# Altium PCB IoT_SYNTHPATCH_ANALOG.PcbDoc (part 2 of 2)
Units mm, origin at the board's own origin, x right, y up, seen from the top; angles counter-clockwise.
Board outline 109 x 54 mm, 4 copper layers (Top Layer, PWR, GND, Bottom Layer), stack 1.587 mm thick; 165 components, 141 nets, 542 pads, 344 vias.
Unrouted connection lines stored in the file: 4.
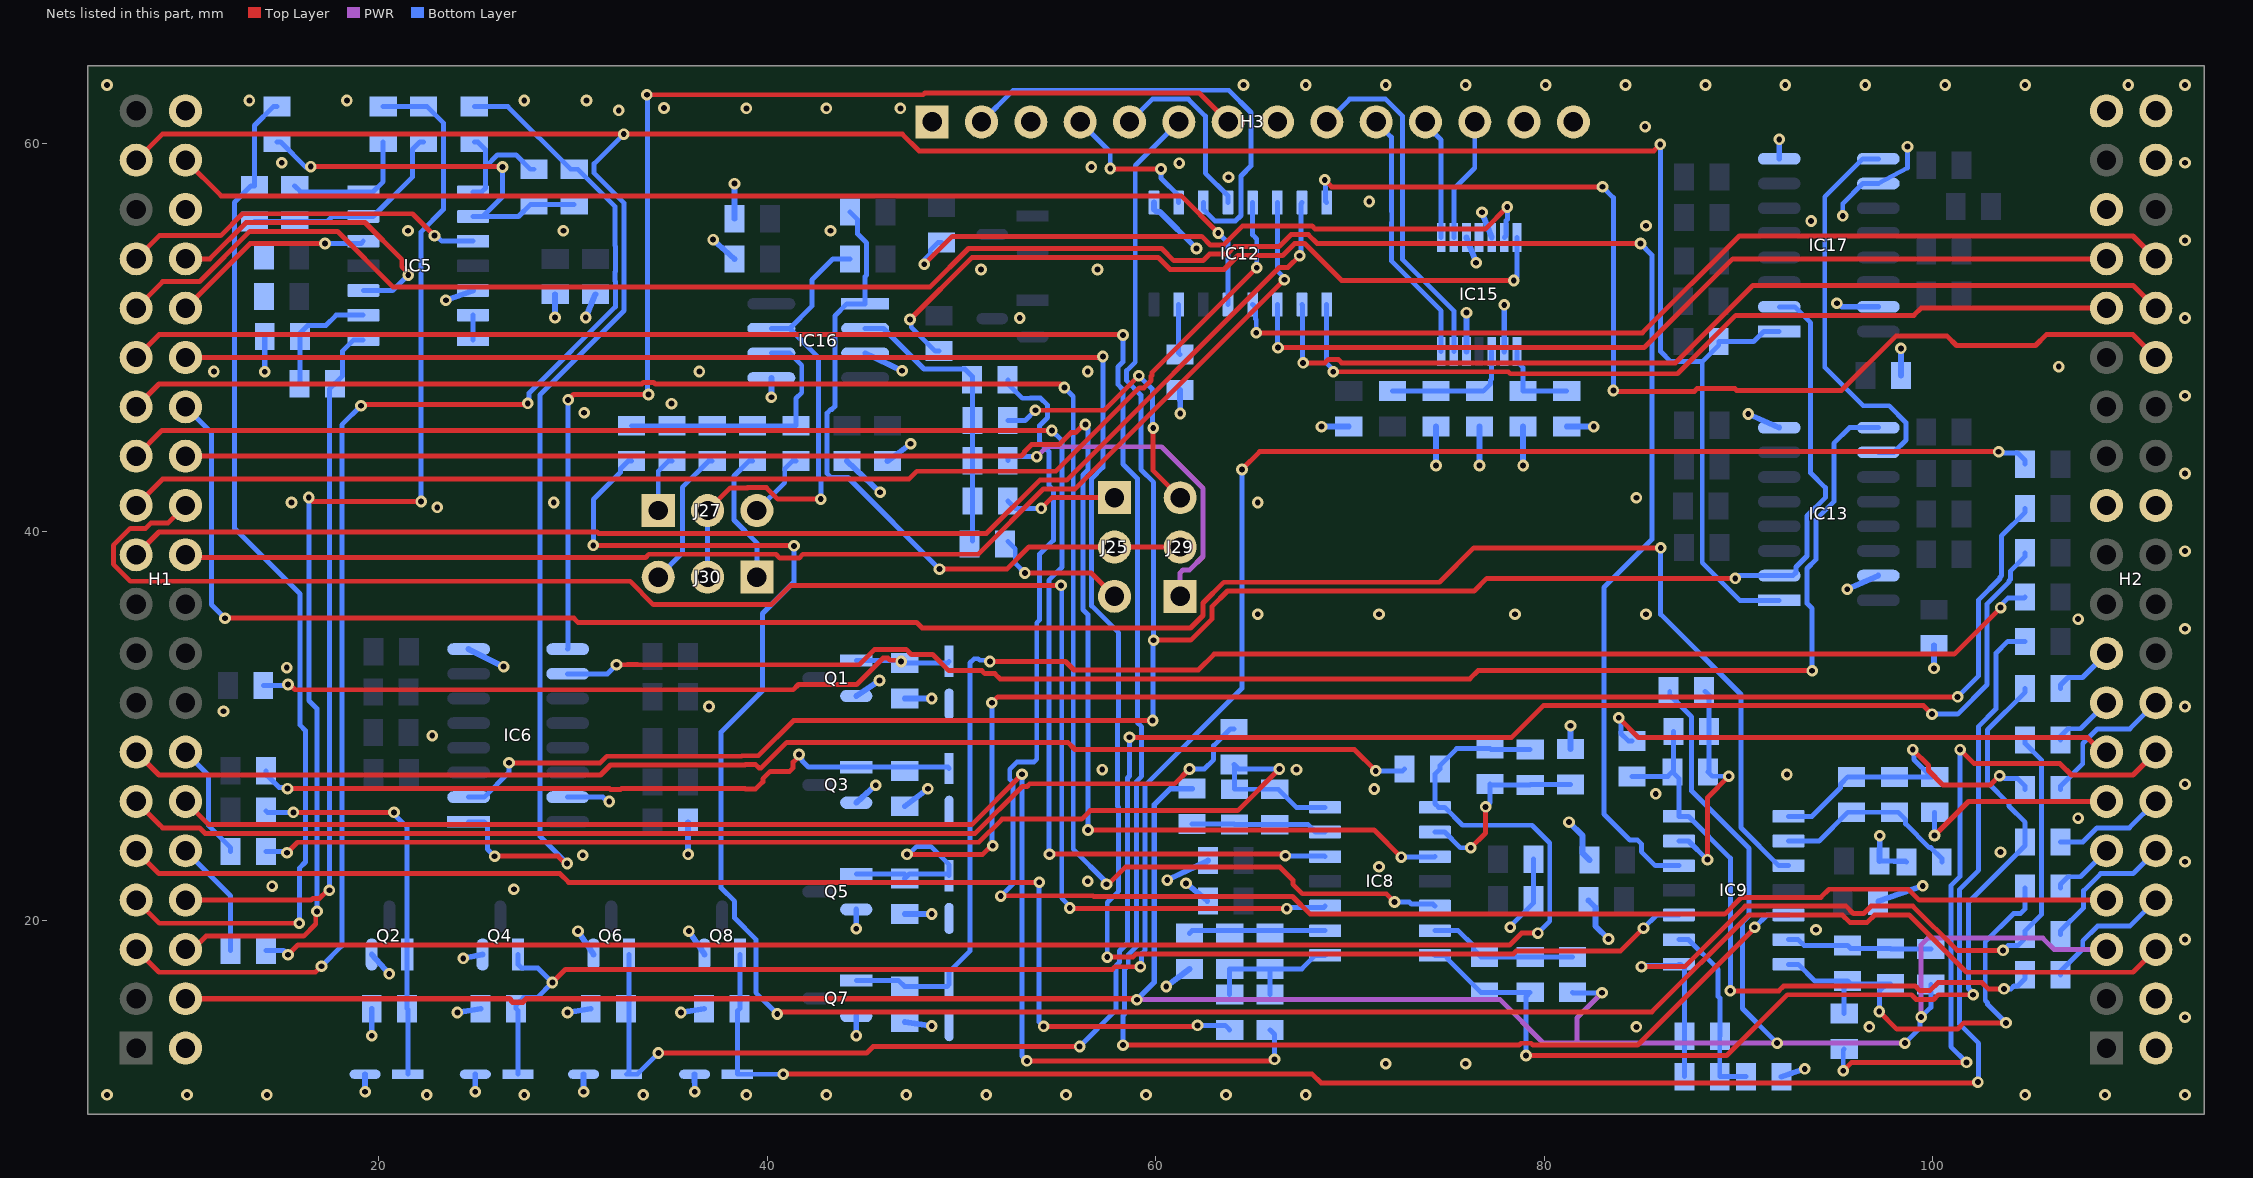
[diagram p4: the nets of this part, all layers, seen from the top]

## Via types
v1: diameter 0.6, hole 0.3, Top Layer to Bottom Layer, 342 vias
v2: diameter 0.8, hole 0.4, Top Layer to Bottom Layer, 2 vias

## Nets (pads, with @x,y where several pads share a name; then routed paths per layer and width w, separated by ;. In a path a pad name is that pad's centre, name@x,y a point inside that pad or via, vN(x,y) a via of type N, cw(c..) or ccw(c..) an arc to the next point about the centre after c; other vN are vias at no path point) (continued)
GND: C30.1 C31.1 C34.2 C44.2 C45.2 C46.2 C47.2 C48.2 C49.2 C50.2 C51.2 C58.1 C59.1 C60.2 C67.1 C68.1 C70.1 C71.1 C73.1 C74.2 C75.2 C76.2 C77.2 C87.2 D3.2 D4.2 D5.2 D6.2 D7.2 D8.2 D9.2 D10.2 H1.2 H1.36 H1.40 H2.2 H2.4 H2.23 H2.24 H2.35 H2.38 H2.39 H2.40 H3.1 H3.3 H3.8 H3.13 H3.14 IC5.12 IC6.8 IC6.15 IC12.1 IC13.8 IC13.15 IC15.2 IC15.5 IC15.10 IC15.11 IC15.12 IC16.3 IC16.5 IC17.8 IC17.10 IC17.15 Q1.2 Q2.2 Q3.2 Q4.2 Q5.2 Q6.2 Q7.2 Q8.2 R20.1 R30.1 R31.1 R42.1 R43.1 R46.1 R47.1 R50.1 R51.1 R54.1 R56.1 R66.1 R68.1 R80.1 | length 105
  Top Layer w0.254: v1(31.861,26.105) v1@31.922,26.166
  Bottom Layer w0.25: IC17.10@97.209,57.93 98.709,58.73 v1(98.709,59.83) ; C48.2@97.277,23.036 R56.1@98.653,22.985
  Bottom Layer w0.254: IC6.15@29.721,26.332 31.54,26.332 31.768,26.105 v1(31.861,26.105) ; v1(78.257,19.634) 78.257,19.683 79.45,20.876 C46.2@79.45,21.063 C47.2@79.45,23.137 ; v1(95.377,56.261) 95.377,56.896 96.411,57.93 IC17.10@97.209,57.93 ; C48.2@97.277,23.036 98.602,23.036 R56.1@98.653,22.985
  Bottom Layer w0.3: v1(14.12,48.24) R20.1@14.12,50.044 ; D4.2@19.289,12.061 v1(19.29,11.16) ; Q2.2@19.627,18.23 v1(20.53,17.23) ; R31.1@19.629,15.436 v1(19.63,14.04) ; v1(23.45,51.92) IC5.12@24.845,52.418 ; v1(24.04,15.24) R43.1@25.24,15.436 ; v1(24.34,18.03) Q4.2@25.338,18.23 ; IC6.8@24.62,33.952 v1(26.42,33.05) ; v1(24.96,11.16) D6.2@24.964,12.061 ; v1(29.07,51.03) C31.1@29.075,52.226 ; v1(29.71,15.24) R47.1@30.906,15.436 ; v1(30.25,19.43) Q6.2@31.048,18.23 ; v1(30.54,11.16) D8.2@30.541,12.061 ; v1(30.65,51.03) C59.1@31.149,52.226 ; v1(35.55,15.24) R51.1@36.748,15.436 ; v1(35.92,23.382) C34.2@35.922,25.038 C34.2@35.922,25.038 ; v1(35.96,19.43) Q8.2@36.759,18.23 ; D10.2@36.256,12.061 v1(36.26,11.16) ; v1(37.21,55.04) C74.2@38.311,54.041 ; v1(38.31,57.921) C75.2@38.311,56.115 C75.2@38.311,56.115 ; IC16.5@40.208,47.922 v1(40.21,46.92) ; C77.2@44.11,43.632 v1(45.81,42.03) ; v1(44.58,14.05) Q7.2@44.581,15.054 ; v1(44.58,19.55) Q5.2@44.581,20.549 ; Q3.2@44.581,26.044 v1(45.58,26.94) ; Q1.2@44.581,31.539 v1(45.78,32.34) ; IC16.3@45.04,49.192 v1(46.94,48.29) ; C76.2@46.184,43.632 v1(47.38,44.53) ; R50.1@47.074,14.754 v1(48.47,14.55) ; R46.1@47.074,20.307 v1(48.47,20.31) ; R42.1@47.074,25.861 v1(48.27,26.76) ; R30.1@47.074,31.414 v1(48.47,31.41) ; IC12.1@59.911,56.948 59.911,56.598 60.036,56.473 60.215,56.473 v1(62.103,54.585) ; v1(60.54,16.58) R54.1@61.736,17.485 ; v1(60.59,22.06) C44.2@62.687,23.061 ; R80.1@61.257,47.291 v1(61.26,46.09) ; v1(61.56,21.89) C45.2@62.657,20.987 ; v1(68.54,45.41) C73.1@69.944,45.41 ; v1(74.43,43.41) C71.1@74.431,45.41 ; IC15.5@76,49.277 v1(76,51.28) ; IC15.10@76,55.153 v1(76.5,53.85) ; v1(76.67,43.41) C70.1@76.675,45.41 ; v1(76.8,56.45) IC15.12@77.3,55.153 ; IC15.2@77.95,49.277 v1(77.95,51.68) ; C68.1@78.918,45.41 v1(78.92,43.41) ; C67.1@81.162,45.41 v1(82.56,45.41) ; v1(81.28,25.044) 81.984,24.34 81.984,23.448 C50.2@82.346,23.086 ; v1(81.36,30.01) R66.1@81.362,28.808 ; C51.2@82.285,21.012 82.647,20.65 82.647,19.69 v1(83.312,19.025) ; v1(90.51,46.06) IC13.8@92.107,45.357 ; IC17.8@92.107,59.2 v1(92.11,60.2) ; R68.1@92.223,11.936 v1(93.42,12.34) ; v1(95.078,51.765) 95.159,51.765 95.344,51.58 IC17.15@97.209,51.58 ; v1(95.61,37.04) IC13.15@97.209,37.737 ; C49.2@97.202,20.962 v1(99.5,21.76) ; C48.2@97.277,23.036 v1(97.28,24.34) ; C87.2@98.37,48.041 v1(98.37,49.44) ; C60.2@100.075,34.156 v1(100.08,32.96)
  other v1: 6,11 10.12,11 14.23,11 22.46,11 27.48,11 33.61,11 38.92,11 43.04,11 47.15,11 51.27,11 55.38,11 59.5,11 63.62,11 67.73,11 104.77,11 108.88,11 113,11 71.85,12.6 75.96,12.6 84.75,14.5 96.75,14.5 113,15 113,19 94,19.5 26.949,21.59 14.5,21.75 56.5,22 71.5,22.75 113,23 30.492,23.343 103.5,23.5 107.5,25.25 85.75,26.5 71.25,26.75 113,27 92.5,27.5 57.25,27.75 67.25,27.75 22.75,29.5 12,30.75 37,31 113,31 15.25,33 113,35 107.5,35.5 65.25,35.75 71.5,35.75 78.5,35.75 85.25,35.75 113,39 23,41.25 15.5,41.5 29,41.5 65.25,41.5 84.75,41.75 113,43 30.568,46.126 35.064,46.595 113,47 11.5,48.25 36.5,48.25 56.5,48.25 106.5,48.5 53,51 113,51 51,53.5 57,53.5 113,55 21.5,55.5 29.5,55.5 43.25,55.5 85.25,55.75 93.75,56 71,57 63.75,58.25 56.686,58.78 61.214,58.979 15,59 113,59 85.203,60.858 32.346,61.697 38.92,61.8 43.04,61.8 46.85,61.8 34.683,61.82 13.33,62.2 18.35,62.2 27.48,62.2 30.69,62.2 6,63 64.52,63 67.73,63 71.85,63 75.96,63 80.08,63 84.19,63 88.31,63 92.42,63 96.54,63 100.65,63 104.77,63 110.08,63 113,63
IN_J26: H2.7 R126.1 | length 88.3
  Top Layer w0.254: v1(52.019,21.234) 52.037,21.252 56.784,21.252 56.818,21.217 67.046,21.217 67.956,20.307 89.3,20.307 90.162,21.169 94.251,21.169 94.67,21.589 98.759,21.589 99.318,21.03 H2.7@108.96,21.03
  Bottom Layer w0.254: v1(52.019,21.234) 52.657,21.873 52.657,27.075 52.484,27.248 52.484,27.768 52.852,28.135 53.725,28.135 53.873,28.284 53.873,35.304 54.026,35.457 54.026,38.85 54.729,39.553 54.729,42.161 54.5,42.39 54.5,44.126 54.026,44.6 54.026,45.472 54.432,45.878 54.432,46.513 54.064,46.88 53.545,46.88 53.535,46.871 53.128,46.871 52.383,47.616 R126.1@52.383,47.803
IN_J28: H2.6 R130.1 | length 117.6
  Top Layer w0.254: v1(31.039,39.294) 31.041,39.292 41.349,39.292 41.351,39.294 v1(41.377,39.268) ; v1(40.513,15.164) 40.623,15.273 85.551,15.273 90.538,20.261 95.362,20.261 95.742,19.881 96.638,19.881 97.018,20.261 98.802,20.261 101.751,17.313 110.323,17.313 H2.6@111.5,18.49
  Bottom Layer w0.254: v1(31.039,39.294) 31.039,41.657 32.44,43.059 32.44,43.246 32.826,43.632 R130.1@33.013,43.632 ; v1(40.513,15.164) 39.413,16.264 39.413,19.012 38.315,20.109 38.315,20.964 37.617,21.662 37.617,29.676 39.751,31.809 39.751,35.785 41.377,37.411 v1(41.377,39.268)
IO2: H1.38 IC12.13 | length 58.6
  Top Layer w0.254: H1.38@10.04,59.13 11.876,57.294 61.309,57.294 v1(63.224,55.38)
  Bottom Layer w0.254: v1(63.224,55.38) 63.721,54.882 IC12.13@63.721,51.698
IO3: H1.37 IC6.1 IC13.1 IC17.1 R1.1 | length 160.3
  Top Layer w0.254: H1.37@7.5,59.13 8.843,60.473 v1(32.606,60.473) 46.954,60.473 47.814,59.614 85.649,59.614 v1(85.979,59.944) ; v1(25.959,23.292) 29.218,23.292 29.599,22.911 v1(29.693,22.911)
  Bottom Layer w0.254: IC6.1@24.62,25.062 25.418,25.062 25.595,24.885 25.595,23.656 v1(25.959,23.292) ; v1(29.693,22.911) 28.292,24.311 28.292,47.052 32.63,51.39 32.63,56.919 31.084,58.465 31.084,58.952 v1(32.606,60.473) ; v1(85.979,59.944) 86.005,59.918 86.005,49.282 86.528,48.758 88.145,48.758 ; IC13.1@92.107,36.467 90.083,36.467 88.145,38.405 88.145,48.758 ; IC17.1@92.107,50.31 91.309,50.31 90.793,49.794 R1.1@88.993,49.794 88.993,49.607 88.145,48.758
IO16: H3.5 IC12.4 | length 9.7
  Bottom Layer w0.254: H3.5@58.65,61.1 59.827,62.277 61.678,62.277 62.553,61.402 62.553,58.466 63.721,57.298 IC12.4@63.721,56.948
IO17: H3.4 IC12.2 | length 7.8
  Top Layer w0.254: v1(57.658,58.699) 57.683,58.674 v1(60.274,58.674)
  Bottom Layer w0.254: H3.4@56.11,61.1 57.658,59.552 v1(57.658,58.699) ; v1(60.274,58.674) 60.274,58.205 61.181,57.298 IC12.2@61.181,56.948
IO18: H3.2 IC12.3 | length 23.2
  Bottom Layer w0.254: H3.2@51.03,61.1 52.661,62.731 63.764,62.731 64.907,61.588 64.907,58.836 64.389,58.318 64.389,56.283 64.102,55.996 63.34,55.996 63.329,56.007 63.042,56.007 62.451,56.598 IC12.3@62.451,56.948
IO35: H3.9 IC15.6 | length 18
  Bottom Layer w0.254: H3.9@68.81,61.1 69.987,62.277 71.838,62.277 72.713,61.402 72.713,54.008 75.35,51.371 IC15.6@75.35,49.277
IO36: H3.11 IC15.8 | length 6.3
  Bottom Layer w0.254: H3.11@73.89,61.1 73.89,60.978 74.7,60.169 IC15.8@74.7,55.153
IO37: H3.10 IC15.7 | length 13.2
  Bottom Layer w0.254: H3.10@71.35,61.1 72.136,60.314 72.136,56.487 72.153,56.47 72.153,55.95 72.136,55.933 72.136,53.943 74.7,51.379 IC15.7@74.7,49.277
IO42: H3.12 IC15.9 | length 6.4
  Bottom Layer w0.254: IC15.9@75.35,55.153 75.35,57.647 76.43,58.727 H3.12@76.43,61.1
IO47: H3.6 IC6.2 IC13.2 IC17.2 | length 120.3
  Top Layer w0.254: v1(26.695,28.1) 31.397,28.1 31.734,28.437 38.668,28.437 38.694,28.462 39.542,28.462 41.356,30.277 v1(59.842,30.277) ; v1(59.893,34.412) 61.804,34.412 62.888,35.496 62.888,36.139 63.693,36.944 76.396,36.944 77.046,37.594 v1(89.842,37.594)
  Bottom Layer w0.254: IC6.2@24.62,26.332 25.418,26.332 26.695,27.61 v1(26.695,28.1) ; v1(59.842,30.277) 59.868,30.302 v1@59.868,34.412 ; v1(59.893,34.412) 59.893,42.545 59.243,43.195 59.243,47.033 58.504,47.772 58.504,48.291 58.945,48.732 58.945,58.855 H3.6@61.19,61.1 ; v1(89.842,37.594) 89.985,37.737 IC13.2@92.107,37.737 92.81,37.737 92.973,37.9 92.973,38.182 93.537,38.745 93.537,40.808 94.48,41.752 94.48,42.271 93.727,43.025 93.727,50.759 92.906,51.58 IC17.2@92.107,51.58
IO48: H3.7 IC6.9 | length 63.2
  Top Layer w0.254: v1(29.743,46.787) 30.023,47.066 v1(33.884,47.066) ; v1(33.799,62.5) 48.024,62.5 48.111,62.587 62.243,62.587 H3.7@63.73,61.1
  Bottom Layer w0.254: IC6.9@29.721,33.952 29.743,33.974 v1(29.743,46.787) ; v1(33.799,62.5) 33.841,62.458 33.841,47.109 v1(33.884,47.066)
LED_DS4: H1.23 IC12.5 | length 66.4
  Top Layer w0.254: H1.23@7.5,41.35 8.863,42.713 38.781,42.713 38.788,42.721 47.305,42.721 47.696,43.112 54.862,43.112 59.154,47.404 59.391,47.404 59.758,47.772 59.758,48.008 59.799,48.049 59.799,48.191 v1(65.202,53.594)
  Bottom Layer w0.254: IC12.5@64.991,56.948 64.991,55.281 65.202,55.071 v1(65.202,53.594)
LED_DS5: H1.22 IC12.6 | length 66.9
  Top Layer w0.254: H1.22@10.04,38.81 10.183,38.667 33.726,38.667 33.896,38.838 40.449,38.838 40.646,38.641 41.636,38.641 41.832,38.838 50.854,38.838 54.22,42.204 55.851,42.204 v1(66.624,52.977)
  Bottom Layer w0.254: IC12.6@66.261,56.948 66.261,53.434 66.624,53.071 v1(66.624,52.977)
LED_DS6: H1.21 IC12.7 | length 69.1
  Top Layer w0.254: H1.21@7.5,38.81 8.677,39.987 31.232,39.987 31.307,39.913 51.287,39.913 54.032,42.658 55.418,42.658 66.364,53.604 66.804,53.604 v1(67.412,54.212)
  Bottom Layer w0.254: v1(67.412,54.212) 67.471,54.271 67.471,56.888 IC12.7@67.531,56.948
LED_DS7: H2.30 IC12.8 | length 56.5
  Top Layer w0.254: v1(68.707,58.115) 69.063,57.76 v1(83.007,57.76) ; v1(83.566,47.269) 83.609,47.227 87.737,47.227 87.874,47.363 89.82,47.363 89.914,47.269 95.31,47.269 98.108,50.067 100.76,50.067 101.239,49.589 105.306,49.589 105.864,50.147 110.323,50.147 H2.30@111.5,48.97
  Bottom Layer w0.254: v1(68.707,58.115) 68.754,58.068 68.754,56.995 IC12.8@68.801,56.948 ; v1(83.007,57.76) 83.566,57.201 v1(83.566,47.269)
LED_DS8: H2.31 IC12.9 | length 44.9
  Top Layer w0.254: v1(69.143,48.237) 78.155,48.237 78.259,48.133 86.87,48.133 89.875,51.138 99.036,51.138 99.408,51.51 H2.31@108.96,51.51
  Bottom Layer w0.254: IC12.9@68.801,51.698 68.801,48.672 69.143,48.33 v1(69.143,48.237)
LED_DS9: H2.32 IC12.10 | length 49.2
  Top Layer w0.254: v1(67.589,48.692) 68.711,48.692 68.883,48.864 69.402,48.864 69.574,48.692 86.763,48.692 90.758,52.687 110.323,52.687 H2.32@111.5,51.51
  Bottom Layer w0.254: IC12.10@67.531,51.698 67.56,51.669 67.56,48.721 v1(67.589,48.692)
LED_DS10: H2.33 IC12.11 | length 46.8
  Top Layer w0.254: v1(66.294,49.479) 85.146,49.479 89.717,54.05 H2.33@108.96,54.05
  Bottom Layer w0.254: IC12.11@66.261,51.698 66.277,51.681 66.277,49.496 v1(66.294,49.479)
LED_DS11: H2.34 IC12.12 | length 50.4
  Top Layer w0.254: v1(65.176,50.241) 76.507,50.241 76.524,50.224 77.044,50.224 77.061,50.241 85.061,50.241 90.047,55.227 110.323,55.227 H2.34@111.5,54.05
  Bottom Layer w0.254: IC12.12@64.991,51.698 65.139,51.55 65.139,50.96 65.176,50.922 v1(65.176,50.241)
LED_Q10: H1.12 R96.1 | length 73.9
  Top Layer w0.254: H1.12@10.04,26.11 11.233,24.917 50.521,24.917 v1(53.111,27.508) ; v1(53.365,12.751) 66.04,12.751 v1(66.116,12.827)
  Bottom Layer w0.254: v1(53.111,27.508) 53.111,13.005 v1(53.365,12.751) ; R96.1@65.884,14.351 66.116,14.118 v1(66.116,12.827)
LED_Q11: H1.14 R97.1 | length 6.1
  Bottom Layer w0.254: H1.14@10.04,28.65 11.217,27.473 11.217,24.875 12.367,23.726 R97.1@12.367,23.538
LED_Q12: H1.13 R102.1 | length 67.3
  Top Layer w0.254: H1.13@7.5,28.65 8.677,27.473 31.412,27.473 31.922,27.983 38.856,27.983 38.882,28.008 39.401,28.008 39.574,27.835 39.686,27.835 41.002,29.151 55.48,29.151 55.845,28.786 70.228,28.786 v1(71.331,27.683)
  Bottom Layer w0.254: v1(71.331,27.683) 72.719,27.683 R102.1@72.821,27.785
LED_Q13: H2.17 R103.1 | length 3.2
  Bottom Layer w0.254: R103.1@106.594,31.92 106.594,32.108 106.98,32.493 107.723,32.493 H2.17@108.96,33.73
LED_Q14: H2.16 R108.1 | length 7.5
  Bottom Layer w0.254: R108.1@106.594,26.713 106.594,26.901 107.738,28.044 107.738,29.093 108.496,29.851 110.161,29.851 H2.16@111.5,31.19
LED_Q15: H2.14 R109.1 | length 35.4
  Top Layer w0.254: v1(95.402,12.243) 95.834,12.675 v1(101.752,12.675) ; v1(101.422,28.778) 102.141,28.059 106.568,28.059 107.154,27.473 110.323,27.473 H2.14@111.5,28.65
  Bottom Layer w0.254: v1(95.402,12.243) 95.402,13.311 R109.1@95.451,13.36 ; v1(101.422,28.778) 101.422,22.254 100.946,21.778 100.946,13.481 v1(101.752,12.675)
LED_Q16: H2.15 R114.1 | length 3.3
  Bottom Layer w0.254: R114.1@106.594,29.279 106.594,29.466 106.98,29.852 107.622,29.852 H2.15@108.96,31.19
LED_Q17: H2.13 R115.1 | length 27.4
  Top Layer w0.254: v1(83.845,30.415) 84.855,29.405 107.974,29.405 108.73,28.65 H2.13@108.96,28.65
  Bottom Layer w0.254: v1(83.845,30.415) 83.845,30.321 83.951,30.216 83.951,29.611 84.336,29.226 R115.1@84.524,29.226
NetC32_1: C32.1 IC5.8 R26.2 | length 6.5
  Bottom Layer w0.254: IC5.8@24.845,57.498 25.296,57.498 25.494,57.696 25.494,58.791 ; R26.2@24.91,60.065 25.097,60.065 25.483,59.68 25.483,58.802 25.494,58.791 ; C32.1@27.983,58.663 27.796,58.663 27.056,59.403 26.105,59.403 25.494,58.791
NetC32_2: C32.2 IC5.9 R22.2 R23.2 | length 20.6
  Top Layer w0.254: v1(16.49,58.797) 26.344,58.797 v1(26.365,58.776)
  Bottom Layer w0.254: R23.2@14.75,60.065 14.937,60.065 16.227,58.776 16.469,58.776 v1(16.49,58.797) ; IC5.9@24.845,56.228 IC5.9@25.345,56.228 ; v1(26.365,58.776) 26.365,57.248 IC5.9@25.345,56.228 ; R22.2@30.057,56.838 C32.2@27.983,56.838 27.796,56.838 27.186,56.228 IC5.9@25.345,56.228
NetC33_1: C33.1 IC5.7 R27.2 | length 6.9
  Bottom Layer w0.254: C33.1@15.664,57.801 15.967,57.498 IC5.7@19.195,57.498 19.695,57.498 20.22,58.023 R27.2@20.22,60.065
NetC33_2: C33.2 IC5.6 R21.2 R25.1 | length 11.2
  Bottom Layer w0.254: R25.1@13.59,55.976 C33.2@15.664,55.976 17.34,55.976 17.592,56.228 IC5.6@19.195,56.228 19.695,56.228 21.721,58.254 21.721,59.68 22.106,60.065 R21.2@22.294,60.065
NetC35_1: C35.1 IC8.1 R52.2 R55.1 R96.2 | length 7.8
  Bottom Layer w0.254: R55.1@63.81,16.176 R52.2@63.81,17.485 C35.1@65.884,17.485 ; R96.2@65.884,16.176 C35.1@65.884,17.485 ; IC8.1@68.725,18.184 68.225,18.184 67.526,17.485 C35.1@65.884,17.485
NetC35_2: C35.2 IC8.2 R52.1 R54.2 | length 7
  Bottom Layer w0.254: R54.2@61.736,19.31 61.879,19.454 IC8.2@68.725,19.454
NetC36_1: C36.1 IC9.1 R53.2 R57.1 R108.2 | length 17.6
  Top Layer w0.254: v1(98.984,28.778) 99.793,27.969 99.793,27.7 100.535,26.957 102.969,26.957 103.443,27.432 v1(103.457,27.432)
  Bottom Layer w0.254: IC9.1@92.586,25.344 93.792,25.344 95.259,26.811 95.259,26.991 95.644,27.377 C36.1@95.832,27.377 R53.2@98.042,27.377 R57.1@99.928,27.377 ; v1(98.984,28.778) 99.05,28.712 99.05,28.255 R57.1@99.928,27.377 ; R57.1@100.116,27.377 R57.1@99.928,27.377 ; v1(103.457,27.432) 103.551,27.432 103.697,27.286 104.384,27.286 104.769,26.901 R108.2@104.769,26.713
NetC36_2: C36.2 IC9.2 R53.1 R56.2 | length 9.8
  Bottom Layer w0.254: IC9.2@92.586,24.074 94.167,24.074 95.644,25.552 C36.2@95.832,25.552 R53.1@98.042,25.552 98.229,25.552 98.615,25.166 98.615,24.959 99.842,23.732 99.919,23.732 100.478,23.172 R56.2@100.478,22.985
NetC52_1: C52.1 IC8.7 R58.2 R61.1 R97.2 | length 62.8
  Top Layer w0.254: v1(15.265,23.47) 15.805,24.009 50.897,24.009 52.089,25.202 56.192,25.202 56.627,25.636 64.219,25.636 66.362,27.78 v1(66.37,27.78)
  Bottom Layer w0.254: R97.2@14.192,23.538 15.197,23.538 v1(15.265,23.47) ; v1(66.37,27.78) 64.268,27.78 R61.1@64.03,28.018 64.051,27.997 R58.2@64.051,26.739 66.123,26.739 C52.1@66.125,26.737 66.313,26.737 67.245,25.804 IC8.7@68.725,25.804
NetC52_2: C52.2 IC8.6 R58.1 R60.2 | length 7
  Bottom Layer w0.254: R60.2@61.872,24.942 64.023,24.942 R58.1@64.051,24.914 66.123,24.914 C52.2@66.125,24.912 67.847,24.912 68.225,24.534 IC8.6@68.725,24.534
NetC53_1: C53.1 IC9.7 R59.2 R63.1 R109.2 | length 24.5
  Top Layer w0.254: v1(97.257,15.291) 98.163,14.384 101.288,14.384 101.61,14.707 v1(103.784,14.707)
  Bottom Layer w0.254: IC9.7@92.586,17.724 93.086,17.724 93.945,16.865 C53.1@95.629,16.865 ; R109.2@95.451,15.185 95.451,16.687 C53.1@95.629,16.865 ; v1(97.257,15.291) 97.266,15.3 97.266,16.327 R59.2@97.651,16.713 ; R59.2@97.839,16.713 R59.2@97.651,16.713 ; v1(103.784,14.707) 102.833,15.658 102.833,15.745 102.718,15.86 102.718,18.879 104.173,20.334 104.526,20.334 104.769,20.578 R63.1@104.769,21.659 ; C53.1@95.629,16.865 95.781,16.713 R59.2@97.651,16.713
NetC53_2: C53.2 IC9.6 R59.1 R62.2 | length 7.5
  Bottom Layer w0.254: IC9.6@92.586,18.994 93.086,18.994 93.39,18.69 C53.2@95.629,18.69 95.781,18.538 R59.1@97.839,18.538 97.863,18.513 R62.2@99.913,18.513
NetC54_1: C54.1 IC8.8 R64.2 R67.1 R102.2 | length 84.8
  Top Layer w0.254: v1(15.316,18.212) 15.823,18.718 78.228,18.718 78.839,19.329 v1(79.68,19.329)
  Bottom Layer w0.254: R67.1@14.192,18.433 15.095,18.433 v1(15.316,18.212) ; R64.2@79.288,28.788 77.251,28.788 C54.1@77.214,28.826 75.499,28.826 74.646,27.973 R102.2@74.646,27.785 74.375,27.513 74.375,26.002 74.573,25.804 74.875,25.804 75.795,24.884 79.378,24.884 80.289,23.973 80.289,19.939 v1(79.68,19.329)
NetC54_2: C54.2 IC8.9 R64.1 R66.2 | length 10
  Top Layer w0.254: v1(76.225,23.724) 76.987,24.486 v1(76.987,25.832)
  Bottom Layer w0.254: IC8.9@74.375,24.534 74.875,24.534 75.685,23.724 v1(76.225,23.724) ; v1(76.987,25.832) 77.214,26.058 C54.2@77.214,27.001 77.251,26.963 R64.1@79.288,26.963 79.308,26.983 R66.2@81.362,26.983
NetC55_1: C55.1 IC9.8 R65.2 R69.1 R114.2 | length 41.4
  Top Layer w0.254: v1(85.014,17.602) 87.237,17.602 90.35,20.715 95.55,20.715 95.93,20.335 96.45,20.335 96.83,20.715 98.991,20.715 101.265,18.44 v1(103.632,18.44)
  Bottom Layer w0.254: v1(85.014,17.602) 85.075,17.663 86.875,17.663 IC9.8@86.936,17.724 87.025,17.724 87.223,17.526 C55.1@87.223,14.019 87.223,11.938 R65.2@87.221,11.936 ; v1(103.632,18.44) 103.874,18.682 104.384,18.682 104.769,19.068 R69.1@104.769,19.255 104.769,19.443 105.609,20.282 105.609,28.252 104.769,29.091 R114.2@104.769,29.279
NetC55_2: C55.2 IC9.9 R65.1 R68.2 | length 9.6
  Bottom Layer w0.254: IC9.9@86.936,18.994 87.436,18.994 88.96,17.47 88.96,16.075 89.048,15.987 C55.2@89.048,14.019 89.046,14.016 R65.1@89.046,11.936 R68.2@90.398,11.936
NetC56_1: C56.1 IC8.14 R70.2 R73.1 R103.2 | length 52.3
  Top Layer w0.254: v1(79.07,13.03) 89.399,13.03 92.523,16.154 98.917,16.154 99.158,15.913 100.054,15.913 100.295,16.154 v1(102.091,16.154)
  Bottom Layer w0.254: IC8.14@74.375,18.184 74.875,18.184 75.073,17.986 75.073,17.957 76.747,16.282 C56.1@76.934,16.282 R70.2@79.288,16.282 79.07,16.065 v1(79.07,13.03) ; v1(102.091,16.154) 102.091,16.24 101.854,16.476 101.854,20.923 104.769,23.839 R73.1@104.769,24.026 104.769,25.038 103.93,25.878 103.93,25.993 102.83,27.093 102.83,29.794 104.769,31.733 R103.2@104.769,31.92
NetC56_2: C56.2 IC8.13 R70.1 R72.2 | length 7.8
  Bottom Layer w0.254: IC8.13@74.375,19.454 75.581,19.454 76.361,18.673 76.361,18.493 76.747,18.107 C56.2@76.934,18.107 R70.1@79.288,18.107 R72.2@81.468,18.107
NetC57_1: C57.1 IC9.14 R71.2 R75.1 R115.2 | length 33.2
  Top Layer w0.254: v1(89.587,16.358) 92.085,16.358 92.335,16.608 99.105,16.608 99.346,16.367 99.866,16.367 100.28,16.781 102.549,16.781 102.871,16.459 v1(103.683,16.459)
  Bottom Layer w0.254: R115.2@84.524,27.401 86.373,27.401 C57.1@86.606,27.633 ; R71.2@86.659,29.707 86.659,27.687 C57.1@86.606,27.633 ; v1(89.587,16.358) 89.587,23.193 87.436,25.344 IC9.14@86.936,25.344 86.936,27.302 C57.1@86.606,27.633 ; v1(103.683,16.459) 104.047,16.459 104.196,16.608 104.384,16.608 104.769,16.994 R75.1@104.769,17.181
NetC57_2: C57.2 IC9.13 R71.1 R74.2 | length 12
  Top Layer w0.254: v1(88.417,23.114) 88.417,26.314 v1(89.51,27.407)
  Bottom Layer w0.254: IC9.13@86.936,24.074 87.436,24.074 88.396,23.114 v1(88.417,23.114) ; R74.2@88.295,31.781 88.484,31.591 R71.1@88.484,29.707 88.484,27.687 C57.2@88.431,27.633 88.657,27.407 v1(89.51,27.407)
NetC69_2: C69.2 IC15.14 | length 38.7
  Top Layer w0.254: v1(47.346,50.927) 50.546,54.127 60.12,54.127 60.743,53.504 63.518,53.504 64.236,54.221 66.534,54.221 67.152,54.839 67.671,54.839 69.576,52.934 v1(78.435,52.934)
  Bottom Layer w0.254: v1(47.346,50.927) 47.412,50.861 47.412,50.533 48.649,49.296 C69.2@48.837,49.296 ; v1(78.435,52.934) 78.6,53.098 IC15.14@78.6,55.153
NetC70_2: C70.2 C71.2 IC15.3 R123.1 | length 6.9
  Bottom Layer w0.254: R123.1@72.188,47.235 C71.2@74.431,47.235 C70.2@76.675,47.235 76.862,47.235 77.248,47.62 77.248,47.808 77.3,47.859 IC15.3@77.3,49.277
NetC72_2: C72.2 IC15.13 | length 35
  Top Layer w0.254: v1(48.082,53.772) 49.522,55.212 62.363,55.212 62.821,54.753 63.483,54.753 64.477,55.747 68.05,55.747 68.213,55.583 76.97,55.583 v1(78.105,56.718)
  Bottom Layer w0.254: v1(48.082,53.772) 48.082,54.002 48.391,54.311 48.391,54.498 48.776,54.884 C72.2@48.964,54.884 ; IC15.13@77.95,55.153 78.048,55.251 78.048,56.026 78.105,56.083 v1(78.105,56.718)
NetC78_1: C78.1 C80.1 IC16.2 R124.1 R125.1 R126.2 | length 15
  Bottom Layer w0.254: IC16.2@45.04,50.462 45.981,50.462 48.067,48.376 50.173,48.376 50.558,47.991 50.558,47.803 C78.1@50.558,45.729 C80.1@50.558,43.655 R124.1@50.558,41.581 R125.1@50.558,39.507
NetC78_2: C78.2 J29.3 | length 14.9
  Top Layer w0.254: v1(53.805,46.253) 57.353,46.253 v1(59.131,48.031) ; v1(59.87,45.337) 59.87,43.137 J29.3@61.257,41.75
  Bottom Layer w0.254: C78.2@52.383,45.729 53.28,45.729 v1(53.805,46.253) ; v1(59.131,48.031) 59.842,47.32 59.842,45.364 v1(59.87,45.337)
NetC79_1: C79.1 C81.1 IC16.6 R128.1 R129.1 R130.2 | length 13.5
  Bottom Layer w0.254: R130.2@33.013,45.457 R128.1@35.087,45.457 C79.1@37.161,45.457 C81.1@39.235,45.457 R129.1@41.471,45.457 41.471,46.861 41.772,47.162 41.772,48.569 41.149,49.192 IC16.6@40.208,49.192
NetC79_2: C79.2 J30.3 | length 7.2
  Bottom Layer w0.254: J30.3@34.384,37.661 35.625,38.901 35.625,42.282 36.974,43.632 C79.2@37.161,43.632
NetC80_2: C80.2 J29.1 | length 17.6
  PWR w0.254: v1(53.873,43.866) 54.381,44.374 60.298,44.374 62.434,42.238 62.434,38.722 61.745,38.033 61.406,38.033 61.257,37.884 J29.1@61.257,36.67
  Bottom Layer w0.254: C80.2@52.383,43.655 52.383,43.842 52.407,43.866 v1(53.873,43.866)
NetC81_2: C81.2 J30.1 | length 7
  Bottom Layer w0.254: C81.2@39.235,43.632 39.048,43.632 38.287,42.871 38.287,40.602 39.464,39.425 J30.1@39.464,37.661
NetD3_1: D3.1 Q1.1 R28.2 R30.2 | length 38.6
  Top Layer w0.254: v1(15.316,32.131) 15.409,32.131 15.68,31.86 41.332,31.86 41.603,32.131 44.602,32.131 45.958,33.487 46.212,33.487 46.319,33.38 46.822,33.38 v1(46.888,33.314)
  Bottom Layer w0.254: R28.2@14.044,32.08 15.265,32.08 v1(15.316,32.131) ; Q1.1@44.581,33.369 R30.2@46.888,33.369 ; v1(46.888,33.314) R30.2@46.888,33.369 ; D3.1@49.363,33.326 49.277,33.239 R30.2@47.074,33.239 46.945,33.369 R30.2@46.888,33.369
NetD4_1: D4.1 Q2.1 R29.2 R31.2 | length 20.4
  Top Layer w0.254: v1(15.596,25.544) v1(20.777,25.544)
  Bottom Layer w0.254: R29.2@14.192,25.612 14.259,25.544 v1(15.596,25.544) ; v1(20.777,25.544) 20.777,25.451 21.457,24.771 Q2.1@21.457,18.23 21.457,15.438 R31.2@21.454,15.436 21.489,15.4 D4.1@21.489,12.061
NetD5_1: D5.1 Q3.1 R39.2 R42.2 | length 37.1
  Top Layer w0.254: v1(15.291,26.772) 31.879,26.772 31.922,26.729 32.442,26.729 32.484,26.772 38.864,26.772 38.882,26.754 39.401,26.754 39.768,27.121 39.768,27.275 40.154,27.661 41.151,27.661 41.331,27.84 41.331,28.131 41.631,28.431 v1(41.631,28.524)
  Bottom Layer w0.254: R39.2@14.192,27.686 14.192,27.499 14.852,26.838 15.225,26.838 v1(15.291,26.772) ; v1(41.631,28.524) 41.631,28.431 41.779,28.282 41.779,28.218 42.123,27.874 Q3.1@44.581,27.874 47.074,27.874 49.295,27.874 D5.1@49.363,27.805
NetD6_1: D6.1 Q4.1 R41.2 R43.2 | length 108.1
  Top Layer w0.254: v1(28.931,16.789) 29.605,17.464 57.765,17.464 57.897,17.596 v1(59.212,17.596) ; v1(64.44,43.205) 65.354,44.12 v1(103.403,44.12)
  Bottom Layer w0.254: D6.1@27.165,12.061 27.165,15.336 R43.2@27.065,15.436 27.065,15.623 27.451,16.009 28.15,16.009 v1(28.931,16.789) 28.193,17.527 27.354,17.527 27.168,17.714 Q4.1@27.168,18.23 ; v1(59.212,17.596) 59.278,17.662 59.278,18.271 59.454,18.447 59.454,26.942 64.44,31.928 v1(64.44,43.205) ; v1(103.403,44.12) 103.497,44.12 103.567,44.05 104.386,44.05 104.771,43.665 R41.2@104.771,43.477
NetD7_1: D7.1 Q5.1 R44.2 R46.2 | length 81.1
  Top Layer w0.254: v1(47.193,23.382) 51.093,23.382 51.542,23.832 v1(51.606,23.832) ; v1(51.562,31.191) 51.867,31.496 v1(101.295,31.496)
  Bottom Layer w0.254: Q5.1@44.581,22.379 R46.2@47.074,22.379 ; R46.2@47.074,22.132 47.321,22.379 D7.1@49.269,22.379 ; v1(47.193,23.382) 47.287,23.382 47.704,23.8 48.415,23.8 49.363,22.851 49.363,22.379 D7.1@49.363,22.285 ; v1(51.562,31.191) 51.562,23.876 v1(51.606,23.832) ; v1(101.295,31.496) 102.362,32.563 102.362,36.474 103.478,37.59 103.478,37.656 103.556,37.734 103.556,39.793 104.771,41.008 R44.2@104.771,41.196
NetD8_1: D8.1 Q6.1 R45.2 R47.2 | length 100.4
  Top Layer w0.254: v1(34.392,13.157) 45.119,13.157 45.449,13.487 v1(56.083,13.487) ; v1(58.649,29.413) 78.326,29.413 79.955,31.042 99.539,31.042 v1(99.974,30.607)
  Bottom Layer w0.254: D8.1@32.741,12.061 33.308,12.061 34.392,13.145 v1(34.392,13.157) ; D8.1@32.769,12.061 32.878,12.17 Q6.1@32.878,18.23 ; v1(56.083,13.487) 57.949,15.353 57.949,17.647 58.133,17.831 58.133,18.409 58.546,18.823 58.546,27.318 58.649,27.421 v1(58.649,29.413) ; v1(99.974,30.607) 101.293,30.607 102.816,32.13 102.816,36.286 103.932,37.402 103.932,37.468 104.01,37.546 104.01,37.965 104.771,38.727 R45.2@104.771,38.914
NetD9_1: D9.1 Q7.1 R48.2 R50.2 | length 78.2
  Top Layer w0.254: v1(51.46,33.314) 55.353,33.314 55.79,32.877 62.195,32.877 63.013,33.695 101.111,33.695 v1(103.507,36.091)
  Bottom Layer w0.254: Q7.1@44.581,16.884 46.769,16.884 R50.2@47.074,16.579 49.254,16.579 49.363,16.688 D9.1@49.363,16.764 49.363,17.331 50.433,18.401 50.433,33.238 50.652,33.457 50.863,33.457 50.939,33.38 51.394,33.38 v1(51.46,33.314) ; v1(103.507,36.091) 103.574,36.157 103.574,36.272 103.878,36.576 104.715,36.576 R48.2@104.771,36.632
NetD10_1: D10.1 Q8.1 R49.2 R51.2 | length 95.3
  Top Layer w0.254: v1(40.818,12.065) 68.062,12.065 68.511,11.616 102.294,11.616 v1(102.337,11.659)
  Bottom Layer w0.254: Q8.1@38.589,18.23 38.589,15.452 R51.2@38.573,15.436 38.456,15.319 D10.1@38.456,12.061 40.814,12.061 v1(40.818,12.065) ; v1(102.337,11.659) 102.379,11.701 102.379,13.658 101.4,14.638 101.4,21.589 102.376,22.566 102.376,29.982 103.27,30.875 103.27,33.745 103.876,34.351 R49.2@104.769,34.351
NetIC5_2: IC5.2 R20.2 R24.2 | length 6.3
  Bottom Layer w0.254: R24.2@15.907,47.622 15.945,47.66 R20.2@15.945,50.044 15.945,50.231 16.33,50.617 17.264,50.617 17.795,51.148 IC5.2@19.195,51.148
NetIC5_13: IC5.13 IC5.14 | length 1.3
  Bottom Layer w0.254: IC5.14@24.845,49.878 IC5.13@24.845,51.148
NetIC12_15: IC12.15 R80.2 | length 2.6
  Bottom Layer w0.254: IC12.15@61.181,51.698 61.181,49.192 R80.2@61.257,49.116
NetIC16_1: IC16.1 J25.2 J29.2 R127.1 | length 35.9
  Top Layer w0.254: v1(48.87,38.075) 52.332,38.075 53.467,39.21 J25.2@57.879,39.21 J29.2@61.257,39.21
  Bottom Layer w0.254: R127.1@44.268,56.457 44.654,56.071 44.654,55.331 45.108,54.877 45.108,53.206 45.04,53.138 IC16.1@45.04,51.732 44.099,51.732 43.476,51.109 43.476,46.445 43.327,46.296 43.275,46.296 43.083,46.104 43.083,42.984 43.275,42.792 44.152,42.792 v1(48.87,38.075)
NetIC16_7: IC16.7 J27.2 J30.2 R131.1 | length 25.8
  Top Layer w0.254: J27.2@36.924,41.09 38.093,42.259 38.969,42.259 38.976,42.267 39.952,42.267 40.543,41.675 v1(42.754,41.675)
  Bottom Layer w0.254: J30.2@36.924,37.661 J27.2@36.924,41.09 ; IC16.7@40.208,50.462 IC16.7@41.149,50.462 ; v1(42.754,41.675) 42.754,42.671 42.629,42.796 42.629,48.982 IC16.7@41.149,50.462 ; R131.1@44.268,54.041 43.375,54.041 42.294,52.96 42.294,51.608 IC16.7@41.149,50.462
NetJ25_1: J25.1 R124.2 | length 5.9
  Top Layer w0.254: v1(54.102,41.199) 54.653,41.75 J25.1@57.879,41.75
  Bottom Layer w0.254: R124.2@52.383,41.581 52.766,41.199 v1(54.102,41.199)
NetJ25_3: J25.3 R125.2 | length 7.1
  Top Layer w0.254: v1(53.264,37.871) 56.678,37.871 J25.3@57.879,36.67
  Bottom Layer w0.254: R125.2@52.383,39.507 52.769,39.122 52.769,38.366 v1(53.264,37.871)
NetJ27_1: J27.1 R128.2 | length 2.9
  Bottom Layer w0.254: J27.1@34.384,41.09 34.384,43.116 34.9,43.632 R128.2@35.087,43.632
NetJ27_3: J27.3 R129.2 | length 3.5
  Bottom Layer w0.254: J27.3@39.464,41.09 40.898,42.523 40.898,43.246 41.283,43.632 R129.2@41.471,43.632
OUT_J10: H1.9 R55.2 | length 64.4
  Top Layer w0.254: H1.9@7.5,23.57 8.677,22.393 29.324,22.393 29.771,21.946 v1(54,21.946) ; v1(54.229,14.529) 62.103,14.529 v1(62.154,14.58)
  Bottom Layer w0.254: v1(54,21.946) 54,14.757 v1(54.229,14.529) ; v1(62.154,14.58) 63.581,14.58 R55.2@63.81,14.351
OUT_J11: H2.11 R57.2 | length 10.8
  Top Layer w0.254: v1(100.101,24.359) 101.853,26.11 H2.11@108.96,26.11
  Bottom Layer w0.254: v1(100.101,24.359) 100.101,25.538 R57.2@100.116,25.552
OUT_J12: H1.11 R61.2 | length 59.9
  Top Layer w0.254: H1.11@7.5,26.11 8.677,24.933 8.863,24.747 10.761,24.747 11.045,24.463 50.709,24.463 53.126,26.881 53.371,26.881 53.509,27.019 60.98,27.019 v1(61.741,27.78)
  Bottom Layer w0.254: v1(61.741,27.78) 62.502,27.78 62.979,28.258 62.979,28.98 63.843,29.843 R61.2@64.03,29.843
OUT_J13: H2.9 R63.2 | length 3.3
  Bottom Layer w0.254: R63.2@106.594,21.659 106.594,21.846 106.98,22.232 107.622,22.232 H2.9@108.96,23.57
OUT_J14: H1.10 R67.2 | length 6.1
  Bottom Layer w0.254: H1.10@10.04,23.57 12.367,21.243 R67.2@12.367,18.433
OUT_J15: H2.10 R69.2 | length 7.3
  Bottom Layer w0.254: R69.2@106.594,19.255 106.594,19.443 107.783,20.632 107.783,21.518 108.658,22.393 110.323,22.393 H2.10@111.5,23.57
OUT_J16: H2.12 R73.2 | length 5.8
  Bottom Layer w0.254: R73.2@106.594,24.026 107.752,24.026 108.472,24.747 110.137,24.747 H2.12@111.5,26.11
OUT_J17: H2.8 R75.2 | length 6.9
  Bottom Layer w0.254: R75.2@106.594,17.181 106.594,17.369 107.738,18.513 107.738,18.933 108.496,19.691 110.161,19.691 H2.8@111.5,21.03
OUT_J22: H1.5 R22.1 R26.1 | length 69.9
  Top Layer w0.254: H1.5@7.5,18.49 8.677,17.313 16.729,17.313 v1(17.043,17.628) ; v1(19.075,46.482) 19.139,46.545 27.602,46.545 v1(27.665,46.609)
  Bottom Layer w0.254: v1(17.043,17.628) 18.093,18.677 18.093,45.499 v1(19.075,46.482) ; R26.1@24.91,61.89 26.642,61.89 29.87,58.663 R22.1@30.057,58.663 30.245,58.663 32.152,56.755 32.152,54.724 32.176,54.699 32.176,53.403 32.152,53.378 32.152,52.899 32.176,52.874 32.176,51.578 27.731,47.133 27.731,46.675 v1(27.665,46.609)
OUT_J23: H1.6 R21.1 R27.1 | length 58.7
  Top Layer w0.254: H1.6@10.04,18.49 10.417,18.49 11.099,19.172 16.122,19.172 16.749,19.799 16.749,20.381 v1(16.815,20.447) ; v1(16.383,41.758) 16.586,41.554 v1(22.174,41.554)
  Bottom Layer w0.254: v1(16.383,41.758) 16.397,41.743 16.397,31.304 16.815,30.886 v1(16.815,20.447) ; R27.1@20.22,61.89 R21.1@22.294,61.89 22.481,61.89 23.321,61.051 23.321,56.592 22.174,55.446 v1(22.174,41.554)
Q7: IC6.10 IC13.9 | length 80.4
  Top Layer w0.254: v1(32.233,33.147) 32.786,33.147 32.794,33.156 33.314,33.156 33.323,33.147 44.732,33.147 45.525,33.941 47.148,33.941 47.412,33.677 48.515,33.677 49.35,32.842 51.045,32.842 51.201,32.687 51.72,32.687 51.984,32.423 76.179,32.423 76.599,32.842 v1(93.802,32.842)
  Bottom Layer w0.254: IC6.10@29.721,32.682 31.768,32.682 v1(32.233,33.147) ; v1(93.802,32.842) 93.802,36.045 93.537,36.311 93.537,38.103 93.991,38.557 93.991,40.62 94.934,41.564 94.934,42.459 94.919,42.474 94.919,44.55 95.726,45.357 IC13.9@97.209,45.357
SER_MENU: IC13.10 IC17.9 | length 20.3
  Bottom Layer w0.254: IC13.10@97.209,44.087 98.007,44.087 98.638,44.718 98.638,45.618 97.772,46.484 96.426,46.484 94.451,48.459 94.451,57.24 96.411,59.2 IC17.9@97.209,59.2
VOCT_A: H1.32 IC5.5 | length 10.6
  Top Layer w0.254: H1.32@10.04,51.51 13.369,54.839 v1(17.221,54.839)
  Bottom Layer w0.254: v1(17.221,54.839) 19.075,54.839 IC5.5@19.195,54.958
VOCT_B: H1.33 IC5.10 | length 18.9
  Top Layer w0.254: H1.33@7.5,54.05 8.695,55.245 11.849,55.245 12.977,56.374 21.731,56.374 v1(22.86,55.245)
  Bottom Layer w0.254: v1(22.86,55.245) 22.954,55.245 23.241,54.958 IC5.10@24.845,54.958
VOUT_REF: H1.7 R23.1 R25.2 | length 53.7
  Top Layer w0.254: H1.7@7.5,21.03 8.693,19.837 v1(15.9,19.837)
  Bottom Layer w0.254: R23.1@14.75,61.89 14.562,61.89 13.59,60.918 R25.2@13.59,57.801 13.403,57.801 12.563,56.961 12.563,40.169 15.943,36.789 15.943,30.032 16.223,29.752 16.223,22.995 15.9,22.672 v1(15.9,19.837)
VOUTA: H1.24 IC8.3 | length 85.6
  Top Layer w0.254: H1.24@10.04,41.35 9.131,40.441 8.256,40.441 7.988,40.173 7.198,40.173 6.323,39.298 6.323,38.322 7.198,37.447 32.933,37.447 34.134,36.246 40.212,36.246 41.202,37.236 v1(55.126,37.236) ; v1(55.575,20.625) 55.593,20.607 66.734,20.607 v1(66.751,20.59)
  Bottom Layer w0.254: v1(55.126,37.236) 55.161,37.202 55.161,21.133 55.575,20.718 v1(55.575,20.625) ; v1(66.751,20.59) 66.817,20.656 68.657,20.656 IC8.3@68.725,20.724
VOUTA2: H1.28 IC9.3 | length 107.3
  Top Layer w0.254: v1(12.073,35.547) 30.035,35.547 30.248,35.335 47.68,35.335 47.976,35.039 61.789,35.039 62.434,35.685 62.434,36.327 63.505,37.398 74.616,37.398 76.385,39.167 v1(86.005,39.167)
  Bottom Layer w0.254: H1.28@10.04,46.43 11.38,45.09 11.38,36.24 v1(12.073,35.547) ; v1(86.005,39.167) 86.005,35.746 90.137,31.614 90.137,24.754 92.086,22.804 IC9.3@92.586,22.804
VOUTB: H1.25 IC8.5 | length 84.3
  Top Layer w0.254: H1.25@7.5,43.89 8.822,45.212 v1(54.653,45.212) ; v1(54.534,23.393) 66.599,23.393 v1(66.675,23.317)
  Bottom Layer w0.254: v1(54.534,23.393) 54.499,23.428 54.499,37.496 55.183,38.18 55.183,44.682 v1(54.653,45.212) ; v1(66.675,23.317) 66.702,23.291 68.698,23.291 IC8.5@68.725,23.264
VOUTB2: H1.29 IC9.5 | length 126
  Top Layer w0.254: H1.29@7.5,48.97 8.677,50.147 58.3,50.147 v1(58.318,50.129) ; v1(58.318,13.564) 78.717,13.564 78.81,13.657 79.33,13.657 79.424,13.564 84.811,13.564 90.841,19.594 v1(90.841,19.629)
  Bottom Layer w0.254: v1(58.318,13.564) 58.318,15.081 58.403,15.165 58.403,17.459 58.587,17.643 58.587,18.221 59,18.635 59,27.13 59.276,27.406 59.276,29.957 59.056,30.177 59.056,42.74 58.318,43.478 58.318,47.315 58.05,47.584 58.05,48.479 58.318,48.747 v1(58.318,50.129) ; v1(90.841,19.629) 91.476,20.264 IC9.5@92.586,20.264
VOUTC: H1.26 IC8.10 | length 86.6
  Top Layer w0.254: H1.26@10.04,43.89 53.064,43.89 53.246,44.072 53.246,44.126 53.614,44.493 55.034,44.493 55.648,45.107 55.876,45.107 56.286,45.517 v1(56.38,45.517) ; v1(56.515,24.638) 71.247,24.638 v1(72.644,23.241)
  Bottom Layer w0.254: v1(56.38,45.517) 56.38,45.423 56.515,45.288 56.515,43.19 56.248,42.923 56.248,35.994 56.515,35.727 v1(56.515,24.638) ; v1(72.644,23.241) 72.656,23.253 74.363,23.253 IC8.10@74.375,23.264
VOUTC2: H1.30 IC9.10 | length 109.6
  Top Layer w0.254: H1.30@10.04,48.97 57.227,48.97 v1(57.278,49.021) ; v1(57.506,18.091) 58.82,18.091 58.993,18.264 78.416,18.264 78.55,18.398 83.925,18.398 v1(85.114,19.587)
  Bottom Layer w0.254: v1(57.278,49.021) 57.278,43.312 56.702,42.735 56.702,36.182 58.092,34.792 58.092,30.365 58.022,30.294 58.022,25.867 58.092,25.796 58.092,21.493 57.506,20.906 v1(57.506,18.091) ; v1(85.114,19.587) 85.792,20.264 IC9.10@86.936,20.264
VOUTD: H1.27 IC8.12 | length 93.1
  Top Layer w0.254: H1.27@7.5,46.43 8.677,47.607 33.538,47.607 33.624,47.693 34.143,47.693 34.23,47.607 55.111,47.607 v1(55.296,47.422) ; v1(57.465,21.844) 57.556,21.844 58.437,22.725 66.401,22.725 67.061,22.066 67.061,21.844 67.549,21.356 71.876,21.356 v1(72.298,20.934)
  Bottom Layer w0.254: v1(55.296,47.422) 55.753,46.965 55.753,23.647 57.465,21.935 v1(57.465,21.844) ; v1(72.298,20.934) 73.061,20.934 73.169,20.827 74.272,20.827 IC8.12@74.375,20.724
VOUTD2: H1.31 IC9.12 | length 117.9
  Top Layer w0.254: H1.31@7.5,51.51 8.863,52.873 10.761,52.873 13.354,55.466 17.864,55.466 20.736,52.594 48.371,52.594 50.358,54.581 60.308,54.581 60.931,53.958 62.435,53.958 62.776,54.299 63.671,54.299 64.047,54.675 66.346,54.675 66.964,55.293 67.859,55.293 68.313,54.839 v1(84.963,54.839)
  Bottom Layer w0.254: v1(84.963,54.839) 85.551,54.251 85.551,39.599 83.083,37.132 83.083,25.451 84.421,24.113 84.819,24.113 85.011,23.922 85.011,23.524 85.73,22.804 IC9.12@86.936,22.804
VREF: H1.34 IC5.3 | length 16.3
  Top Layer w0.254: H1.34@10.04,54.05 11.296,54.05 13.166,55.92 19.282,55.92 21.176,54.026 21.176,53.653 21.514,53.315 v1(21.514,53.221)
  Bottom Layer w0.254: IC5.3@19.195,52.418 20.711,52.418 v1(21.514,53.221)
VREF_5: H1.4 H2.5 R60.1 R62.1 R72.1 R74.1 | length 144.9
  Top Layer w0.28: H1.4@10.04,15.95 26.715,15.95 26.888,15.777 27.418,15.777 27.591,15.95 58.98,15.95 v1(59.03,15.9)
  PWR w0.254: v1(59.03,15.9) 77.733,15.9 79.968,13.665 81.686,13.665 ; v1(82.982,16.256) 81.686,14.961 81.686,13.665 ; v1(91.999,13.665) v1@92.05,13.665 ; v1(98.577,13.665) v1@92.05,13.665 ; v1(99.416,15.011) 99.416,18.728 99.755,19.067 105.682,19.067 106.259,18.49 H2.5@108.96,18.49 ; 81.686,13.665 v1@92.05,13.665
  Bottom Layer w0.254: R72.1@81.468,16.282 81.494,16.256 v1(82.982,16.256) ; R74.1@86.469,31.781 86.469,31.594 87.591,30.472 87.591,26.657 90.548,23.701 90.548,20.223 90.214,19.889 90.214,15.45 v1(91.999,13.665) ; v1(98.577,13.665) 99.349,14.437 99.349,14.945 99.913,15.508 R62.1@99.913,16.688
  Bottom Layer w0.28: v1(59.03,15.9) 59.921,16.792 59.921,25.937 60.752,26.767 R60.1@61.872,26.767
VREF_ADC: C67.2 C68.2 IC15.1 | length 4.4
  Bottom Layer w0.254: IC15.1@78.6,49.277 78.6,48.764 78.918,48.445 C68.2@78.918,47.235 C67.2@81.162,47.235
VREF_BUF: H1.8 IC5.1 R24.1 | length 37
  Top Layer w0.254: H1.8@10.04,21.03 16.511,21.03 16.595,21.114 16.931,21.114 17.356,21.539 v1(17.45,21.539)
  Bottom Layer w0.254: v1(17.45,21.539) 17.45,47.34 R24.1@17.732,47.622 18.117,48.008 18.117,49.3 18.695,49.878 IC5.1@19.195,49.878
pads on no net: IC6.7 IC12.14 IC13.7 IC17.7

## Polygon pours and split planes (outlines as drawn)
GND on Bottom Layer "GND_L04_P001" (solid, pour order 1): 116.662,69.064 116.281,68.683 0,68.683 0,4.014 0.813,3.201 119.228,3.201 119.228,66.371 116.662,68.937
+3.3 on Bottom Layer "+3.3_L04_P000" (solid, pour order 0): 102.514,60.427 102.489,60.401 100.279,60.401 100.178,60.3 100.178,57.81 100.432,57.81 100.787,57.455 101.727,57.455 101.727,56.058 101.575,55.905 100.203,55.905 100.203,51.486 100.025,51.308 94.996,51.308 94.996,46.634 95.047,46.584 95.174,46.711 100.203,46.711 100.203,38.024 100.228,37.998 99.619,37.389 95.402,37.389 95.225,37.211 95.301,37.135 95.301,35.382 98.603,35.382 99.314,34.671 101.194,34.671 101.194,36.195 102.768,37.77 102.616,37.922 102.616,55.093 103.784,55.093 104.673,55.982 104.292,56.363 104.292,58.623 102.514,60.401
GND on Top Layer "GND_L01_P002" (solid, pour order 2): 118.694,68.504 0,68.504 0,0 118.085,0 118.085,68.402 118.567,68.885
GND on PWR "GND_L02_P003" (solid, pour order 3): 119.075,68.631 0.737,68.631 0,67.894 0,0.254 119.304,0.254 119.075,0.483 119.075,68.402
GND on GND (split plane): 113.49,10.51 5.51,10.51 5.51,63.49 113.49,63.49

## Silkscreen, mask and mechanical layers (free items; w line width, h text height)
Mechanical 1:
  lines w0.5: 5,10 5,64 114,64 114,10
  text "POWER_CONNECTOR" at 120,118 h2.5
  text "POWER" at 170,118 h2.5
  text "Main" at 220,118 h2.5
  text "DAC_LFO" at 120,93.25 h2.5
  text "DAC_VOCT" at 170,83.149 h2.5
  text "INPUTS_GATES" at 220,69.95 h2.5
  text "MUTE_BUTTONS" at 170,55.104 h2.5
  text "ADC" at 120,50.06 h2.5
  text "DISPLAY" at 220,34.628 h2.5
  text "MIDI" at 170,29.899 h2.5
  text "MENU_BUTTONS" at 120,23.119 h2.5